# Altium PCB Solar_950_VDC_Standby_PS.PcbDoc (part 2 of 2)
Units mm, origin at the board's own origin, x right, y up, seen from the top; angles counter-clockwise.
Board outline 215 x 110 mm, 2 copper layers (Top Layer, Bottom Layer), stack 1.071 mm thick; 170 components, 77 nets, 404 pads, 55 vias.
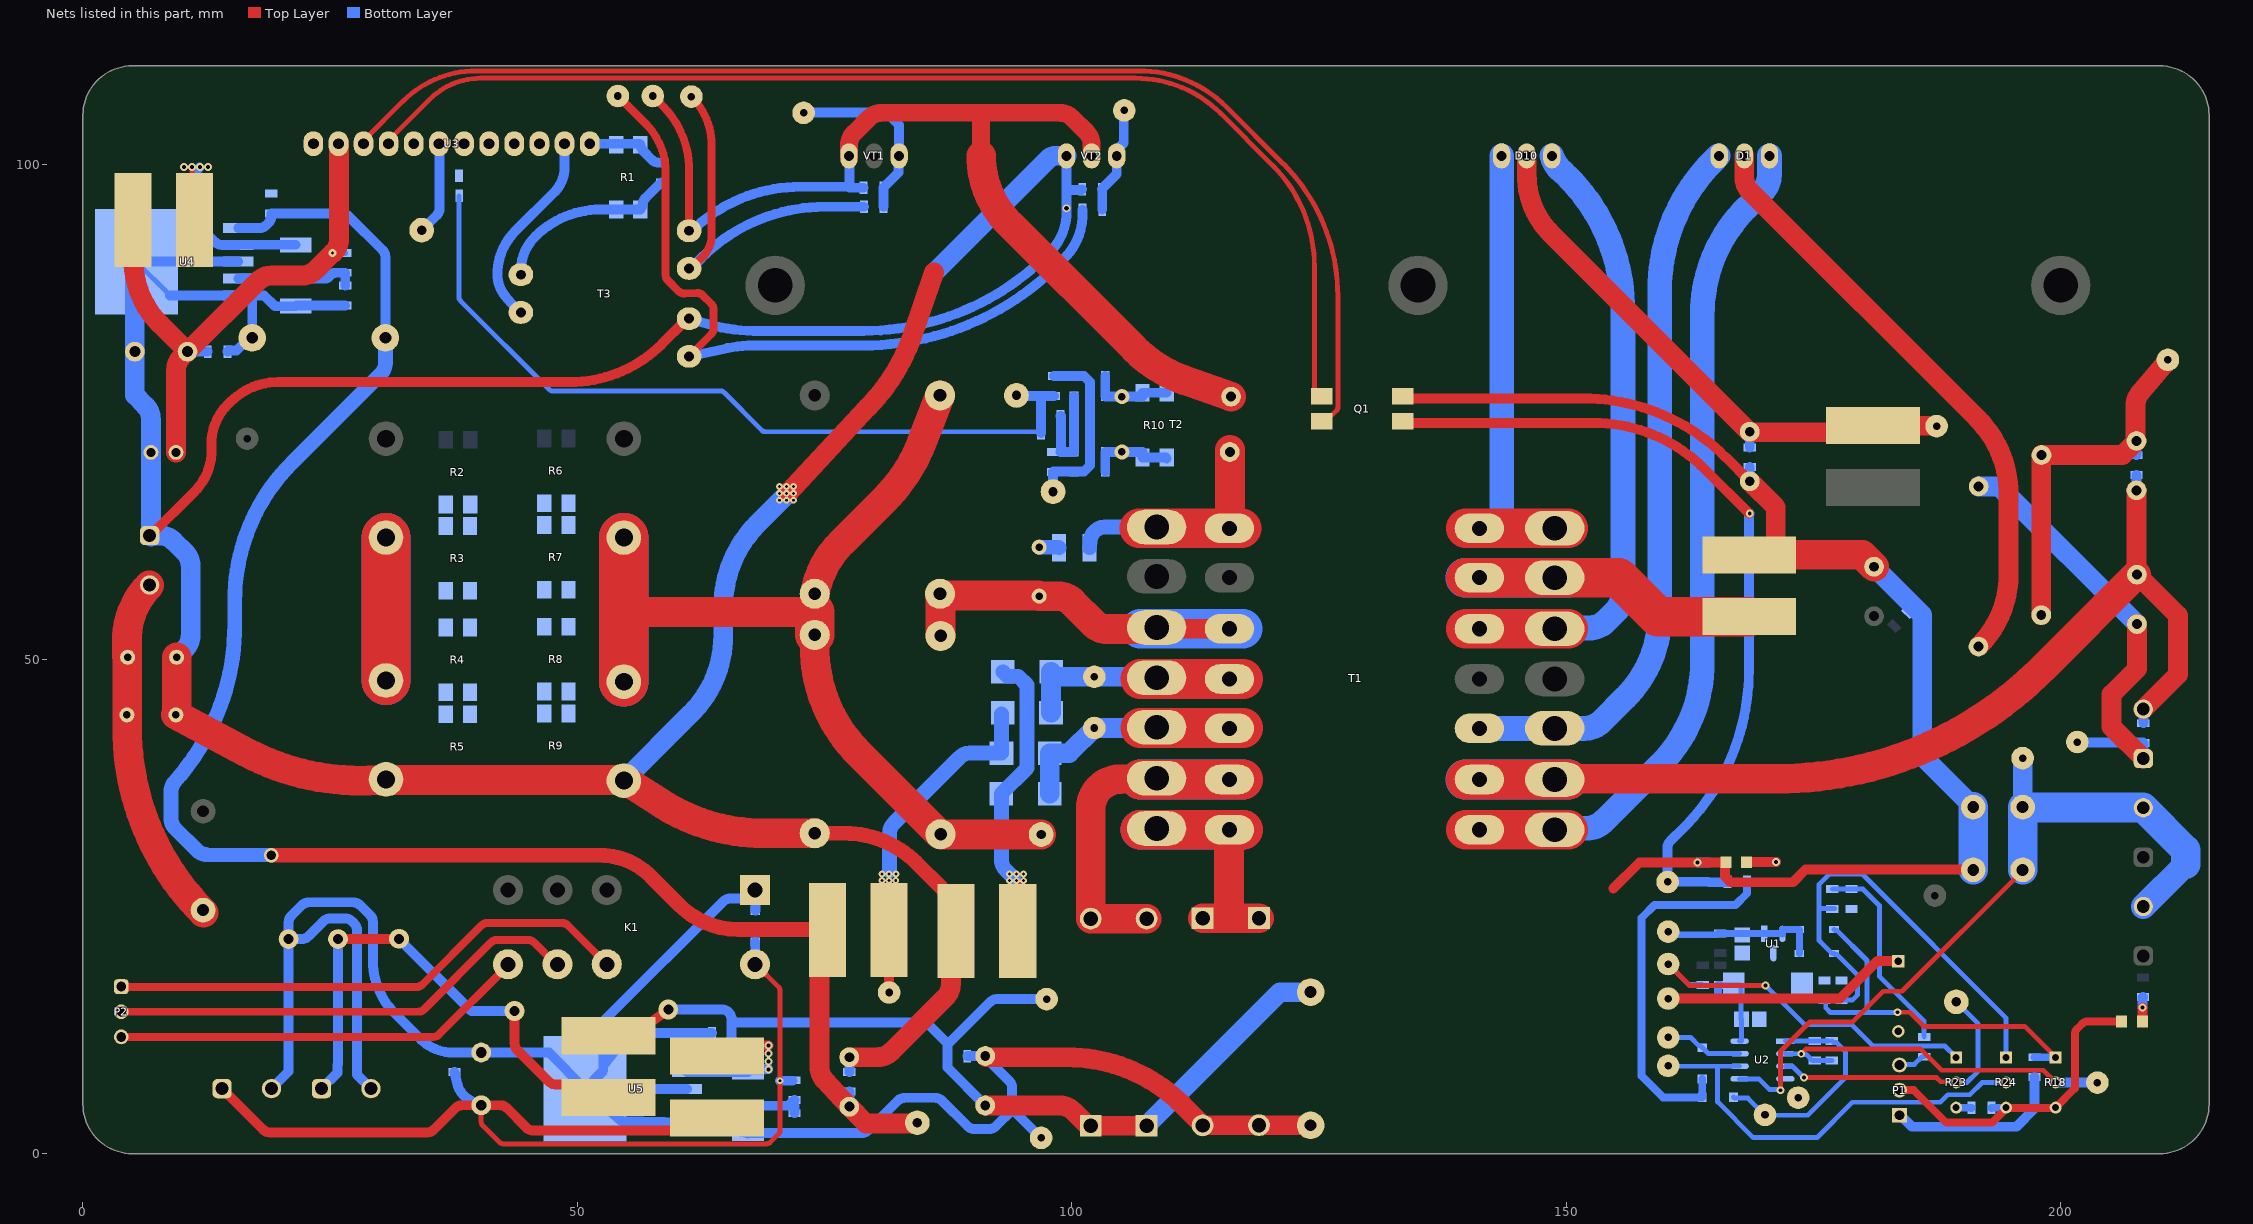
[diagram p2: the nets of this part, all layers, seen from the top]

## Via types
v1: diameter 0.7, hole 0.3, Top Layer to Bottom Layer, tented both sides, 31 vias
v2: diameter 0.8, hole 0.4, Top Layer to Bottom Layer, tented both sides, 18 vias
v3: diameter 2, hole 1, Top Layer to Bottom Layer, tented both sides, 3 vias
v4: diameter 1.5, hole 1, Top Layer to Bottom Layer, tented both sides, 1 vias
v5: diameter 0.8, hole 0.3, Top Layer to Bottom Layer, tented both sides, 1 vias
v6: diameter 0.8, hole 0.5, Top Layer to Bottom Layer, tented both sides, 1 vias

## Nets (pads, with @x,y where several pads share a name; then routed paths per layer and width w, separated by ;. In a path a pad name is that pad's centre, name@x,y a point inside that pad or via, vN(x,y) a via of type N, cw(c..) or ccw(c..) an arc to the next point about the centre after c; other vN are vias at no path point) (continued)
GND: C1.1 C5.2 C6.2 C9.2 C11.2 C13.1 C20.1 C21.1 C22.1 C30.1 C32.1 C38.1 C39.1 D12.2 D17.2 D18.2 J1.1 L7.1 R5.1 R9.1 R19.2 R27.2 R37.1 T3.6 U3.3 U3.4 U3.5 U3.6 U3.8 U3.12 U4.3 U4.5 U4.6 VD1.1 VT2.3 X1.2 | length 404.1
  Top Layer w1: J1.1@6.837,62.5 11.317,66.98 ccw(c7.257,71.042) 13,71.042 13,71.044 13,71.825 13,71.827 cw(c18.487,71.827) 14.599,75.699 14.937,76.037 14.938,76.038 cw(c19.744,71.219) 19.744,78.025 49.257,78.025 49.26,78.025 ccw(c49.26,91.157) 58.534,81.859 60.853,84.178 cw(c61.558,83.469) 60.995,84.295 61.2,84.435 T3.6@61.3,84.435
  Top Layer w1.5: C13.1@74,32.4 77.011,32.4 cw(c77.011,22.045) 84.325,29.375 L7.1@86.822,26.878 ; L7.1@86.873,26.825 L7.1@87.406,26.25
  Top Layer w2: C5.2@30.65,37.85 C5.2@30.713,37.787 ; C11.2@54.638,37.787 C11.2@54.7,37.725 ; C11.2@54.7,37.725 cw(c54.204,35.787) C11.2@55.28,37.474 ; 68.806,32.4 68.809,32.4 ; v1@71.36,66.847 71.553,67.055 71.576,67.079 71.9,67.428 79.325,75.423 cw(c80.788,74.059) 79.362,75.462 ccw(c65.491,89.115) 83.913,82.833 86.05,89.1 ; C9.2@77.5,9.75 80.344,9.75 ccw(c80.344,11.75) 81.757,10.334 87.185,15.762 ccw(c85.769,17.175) 87.769,17.175 87.769,18.75 L7.1@88.281,22.5 L7.1@87.406,26.25
  Top Layer w3: C32.1@9.4,44.375 16.504,40.602 ccw(c28.089,62.416) C5.2@30.65,37.85 ; C32.1@9.475,44.45 C1.1@9.475,50.2 ; C5.2@30.713,37.787 C11.2@54.638,37.787 ; C11.2@55.28,37.474 58.534,35.398 ccw(c68.806,51.499) 68.806,32.4 ; 68.809,32.4 C13.1@74,32.4
  Bottom Layer w0.5: U4.6@5.405,90.2 U4.6@8.809,86.796 ; D18.2@21.525,85.695 D18.2@21.6,85.77 ; D17.2@100.184,76.637 D17.2@100.226,76.595
  Bottom Layer w1: U4.6@5.405,90.2 U4.3@15.71,90.2 ; U4.6@8.809,86.796 U4.5@15.71,86.796 U4.5@17.025,86.796 ; C38.1@14.625,81.1 14.625,81.125 14.725,81.225 15.533,81.225 16.808,82.5 VD1.1@17.119,82.5 17.119,86.702 U4.5@17.025,86.796 ; D18.2@21.525,85.695 19.43,85.695 18.329,86.796 U4.5@17.025,86.796 ; D18.2@21.6,85.77 R37.1@26.525,85.77 ; T3.6@61.34,84.366 63.854,83.711 ccw(c67.891,99.396) 67.827,83.2 67.83,83.2 78.922,83.2 ccw(c78.924,109.484) 97.817,91.211 ccw(c93.808,95.203) v6@99.451,95.599 ; C6.2@77.5,8.275 C9.2@77.5,9.75 ; R19.2@98.863,74.6 98.888,74.575 C21.1@98.888,72.85 98.888,70.976 98.862,70.95 100.2,70.95 D12.2@100.225,70.975 D17.2@100.226,76.595 ; v6(99.46,95.6) 99.46,97.45 ; VT2.3@99.46,100.9 99.46,97.45 ; R27.2@101.05,97.525 100.975,97.45 99.46,97.45
  Bottom Layer w2: U4.6@5.405,90.2 5.248,90.043 C39.1@5.248,81.1 5.248,76.702 6.289,75.661 6.29,75.66 cw(c4.875,74.247) 6.875,74.247 X1.2@6.875,70.914 J1.1@6.875,62.5 ; J1.1@6.75,62.5 J1.1@6.875,62.5 ; J1.1@6.875,62.4 J1.1@6.875,62.5 ; C1.1@9.475,50.2 10.314,51.039 ccw(c8.9,52.453) 10.9,52.453 10.9,59.404 ccw(c8.9,59.404) 10.314,60.818 9.218,61.914 ccw(c7.804,60.5) 7.804,62.5 J1.1@6.875,62.5 ; C11.2@54.7,37.725 61.506,44.531 ccw(c53.68,52.36) 64.75,52.36 64.75,52.363 64.75,55.283 64.75,55.288 cw(c76.669,55.288) 68.244,63.719 v1@71.125,66.6 ; 86.125,89.1 97.633,100.608 cw(c98.339,99.9) 98.339,100.9 VT2.3@99.46,100.9
  other v1: 70.45,66.075 71.15,66.075 71.85,66.075 70.45,66.779 71.15,66.779 71.85,66.779 70.45,67.475 71.15,67.475 71.85,67.475
GND_1: C23.1 C24.1 C25.1 C26.1 C27.2 C29.1 C31.1 C33.2 C34.2 C37.2@181.125,59.35 D13.2 D14.2 D15.2 L3.2 P1.2 Q1.2 R18.3 R21.1 R24.3 R33.1 R34.1 R35.1 TP31.1 U1.3 U2.4 | length 169.8
  Top Layer w0.8: P1.2@183.7,6.425 185.136,6.425 188.426,3.135 193.06,3.135 194.267,4.342 194.267,4.352 194.467,4.552 R24.3@194.467,4.66 ; R24.3@194.496,4.631 R18.3@199.452,4.631 ; R18.3@199.482,4.66 201.425,6.603 201.425,12.069 cw(c202.225,12.069) 201.659,12.634 202.166,13.141 cw(c202.731,12.575) 202.731,13.375 D14.2@206.15,13.375
  Top Layer w1: Q1.2@133.475,76.595 134.075,76.375 151.668,76.375 151.673,76.375 cw(c151.671,55.846) 166.169,70.381 C27.2@168.55,68 ; 154.75,26.8 157.4,29.45 v2(163.25,29.45) 166.124,29.45 D15.2@166.124,29.437 ; D15.2@166.137,29.475 166.087,29.425 166.087,28.982 166.033,28.929 166.033,28.036 166.619,27.45 172.907,27.45 174.182,28.725 R35.1@191.123,28.725
  Top Layer w2: C27.2@168.55,68 171.175,65.375 171.175,61.425 L3.2@170.3,60.55
  Top Layer w3: L3.2@168.5,60.55 179.925,60.55 C37.2@181.125,59.35
  Bottom Layer w0.8: R21.1@192.992,4.635 192.992,4.648 194.454,4.648 R24.3@194.467,4.66
  Bottom Layer w1: v2(163.25,29.45) R33.1@164.437,29.45 ; C27.2@168.55,68 C29.1@168.55,69.425
  Bottom Layer w2: C37.2@181.125,59.35 186,54.475 186,40.198 R34.1@191.15,35.048
  Bottom Layer w3: R35.1@191.15,28.698 R34.1@191.15,35.048
I_SENS: J4.2 J5.2 R34.2 R35.2 TP26.1 U2.5 | length 77.7
  Top Layer w0.5: v2(171.651,6.413) 171.651,10.328 174.648,13.325 178.95,13.325 182.05,16.425 183.95,16.425 196.15,28.625 R35.2@196.15,28.698
  Bottom Layer w0.5: U2.5@167.521,7.571 169.47,7.571 170.57,6.47 171.594,6.47 v2(171.651,6.413) ; R34.2@196.15,35.048 R34.2@196.186,35.011 ; J4.2@208.314,35.011 J4.2@208.35,34.975
  Bottom Layer w2: R34.2@196.15,35.048 TP26.1@196.15,40
  Bottom Layer w2.5: J5.2@208.35,25 212.625,29.275
  Bottom Layer w3: R35.2@196.15,28.698 R34.2@196.15,35.048 ; R34.2@196.186,35.011 J4.2@208.314,35.011 ; J4.2@208.35,34.975 212.625,30.7 212.625,29.275
NetC1_2: C1.2 C32.2 J1.2 RT1.1 | length 35.7
  Top Layer w3: C1.2@4.45,50.275 4.45,51.984 cw(c12.224,51.98) J1.2@6.721,57.472 ; C1.2@4.475,50.2 4.475,44.375 4.475,43.027 ccw(c30.903,43.027) RT1.1@12.2,24.355
NetC2_1: C2.1 C7.2 L1.2 L2.1 TP2.1 | length 37.1
  Top Layer w2: L1.2@198.025,54.453 198.025,70.622 L2.1@198.05,70.647 206.233,70.647 C2.1@207.661,72.075 ; C2.1@207.55,72.186 207.55,75.624 cw(c209.55,75.624) 208.017,76.908 TP2.1@210.839,80.275
  Bottom Layer w1: C7.2@207.661,70.625 C2.1@207.661,72.075
NetC2_2: C2.2 C7.1 C14.2 C15.1 J2.2 T1.9 | length 94
  Top Layer w2: C2.2@207.661,67.075 207.661,58.589 C14.2@207.7,58.55 207.725,58.55 211.85,54.425 211.85,48.45 J2.2@208.35,44.95
  Top Layer w3: T1.9@148.896,37.9 cw(c148.899,36.1) 148.899,37.9 171.216,37.9 171.22,37.9 ccw(c171.22,75.996) 198.138,49.038 C14.2@207.65,58.55
  Bottom Layer w1: C2.2@207.661,67.075 C7.1@207.661,68.625 ; C15.1@208.35,43.525 J2.2@208.35,44.95
NetC3_1: C3.1 C8.1 C16.2 D3.1 D5.1 L5.1 TP1.1 U5.1 VD2.2 | length 98
  Top Layer w1: L5.1@57.4,13.253 v3(59.2,14.575)
  Top Layer w2: C8.1@91.25,4.875 98.747,4.875 cw(c98.747,2.875) 100.159,4.291 101.52,2.93 101.811,2.93 D5.1@101.911,2.83 D3.1@107.561,2.83
  Bottom Layer w1: v3(59.2,14.575) 64.6,14.575 cw(c64.6,13.575) 65.6,13.575 65.6,13.253 ; U5.1@61.085,9.954 63.74,9.954 ccw(c63.74,10.954) 64.446,10.246 65.308,11.108 ccw(c64.6,11.814) 65.6,11.814 C16.2@65.6,12.2 65.6,13.253 ; 87.425,11.025 91.733,15.333 cw(c92.439,14.625) 92.439,15.625 TP1.1@97.45,15.625 ; C8.1@91.25,4.875 87.425,8.7 C3.1@87.425,9.85 87.425,11.131 85.596,12.96 ccw(c84.889,12.253) 84.889,13.253 65.6,13.253
  Bottom Layer w2: D3.1@107.561,2.83 121.062,16.331 VD2.2@124.15,16.331
NetC3_2: C3.2 C8.2 C16.1 C36.2 C37.2@20.8,21.7 C40.1 C41.2 D2.2 D4.2 D19.2 J3.2 J6.2 K1.1 R39.1 TP3.1 U5.3 U5.5 U5.6 VD2.1 VD3.2 | length 233.6
  Top Layer w2: C8.2@91.375,9.75 99.532,9.75 99.538,9.75 cw(c99.535,-6.762) 111.189,4.936 113.08,3.045 D2.2@113.225,2.9 ; D2.2@113.225,2.855 113.238,2.868 118.913,2.868 D4.2@118.925,2.88 124.139,2.88 VD2.1@124.15,2.869
  Bottom Layer w1: J3.2@19.075,6.575 20.8,8.3 C37.2@20.8,21.7 ; J6.2@29.125,6.575 27.725,7.975 C36.2@27.725,8.975 27.725,22.561 ccw(c26.725,22.561) 27.433,23.267 27.193,23.507 ccw(c26.486,22.8) 26.486,23.8 25.039,23.8 ccw(c25.039,22.8) 24.333,23.508 22.817,21.992 cw(c22.111,22.7) 22.111,21.7 C37.2@20.8,21.7 ; C41.2@40.275,10.217 47.113,10.217 U5.6@50.78,6.55 ; C41.2@40.275,10.234 37.575,10.234 37.398,10.234 cw(c37.398,14.837) 34.149,11.576 34.147,11.578 31.503,14.222 cw(c36.762,19.481) 29.325,19.484 29.325,23.411 ccw(c28.325,23.411) 29.032,24.118 28.017,25.133 ccw(c27.311,24.425) 27.311,25.425 22.864,25.425 ccw(c22.864,24.425) 22.158,25.133 21.092,24.067 ccw(c21.8,23.361) 20.8,23.361 C37.2@20.8,21.7 ; U5.3@61.085,6.55 U5.6@50.78,6.55 ; C16.1@63.6,12.2 55.85,12.2 ccw(c55.85,11.2) 55.144,11.908 54.47,11.234 U5.6@52.619,8.885 ; VD3.2@68,24.575 68,26.625 K1.1@67.975,26.65 67.14,25.815 65.48,25.815 ccw(c65.48,24.815) 64.773,25.523 52.911,13.661 ccw(c53.619,12.955) 52.619,12.955 U5.6@52.619,8.885 ; C3.2@89.425,9.85 89.438,9.862 C8.2@91.237,9.862 ; C8.2@91.25,9.781 93.675,7.356 cw(c92.968,6.649) 93.968,6.649 93.968,4.532 TP3.1@96.9,1.6 ; 94.025,4.475 92.331,2.781 cw(c91.625,3.489) 91.625,2.489 90.147,2.489 cw(c90.15,3.489) 89.445,2.78 86.868,5.357 ccw(c86.161,4.65) 86.161,5.65 83.118,5.65 ccw(c83.118,4.65) 82.412,5.358 79.435,2.381 cw(c78.729,3.089) 78.729,2.089 R39.1@71.95,2.089 67.294,2.089 D19.2@67.25,2.045 66.15,2.305 65.474,2.898 ccw(c64.815,2.146) 64.815,3.146 U5.5@61.085,3.146 61.077,3.154 54.47,3.29 U5.6@50.78,6.55 ; U5.6@50.78,6.55 52.619,8.389 U5.6@52.619,8.885
NetC4_2: C4.2 C5.1 R3.1 R4.2 | length 28.9
  Top Layer w5: C5.1@30.65,47.85 C4.2@30.65,62.3
  Bottom Layer w5: C5.1@30.65,47.85 C4.2@30.65,62.3
NetC6_1: C6.1 C9.1 C30.2 L6.1 TP11.1 U4.1 VD1.2 | length 178.5
  Top Layer w1: 52.3,30.175 52.302,30.175 ; 60.308,25.146 ccw(c66.272,31.106) 60.31,25.144
  Top Layer w1.5: v4(19.05,30.175) 52.3,30.175 ; 52.302,30.175 cw(c52.3,22.983) 57.388,28.066 60.308,25.146 ; 60.31,25.144 ccw(c66.272,31.106) 66.274,22.675 L6.1@74.475,22.675
  Top Layer w2: L6.1@74.475,21.825 74.475,8.78 ccw(c76.475,8.78) 75.012,7.417 77.453,4.799 ccw(c78.916,6.162) C9.1@77.5,4.75 C9.1@77.5,4.75 79.19,3.06 TP11.1@84.31,3.06
  Bottom Layer w1: U4.1@15.71,93.604 17.84,93.604 ccw(c17.84,94.604) 18.546,93.896 18.758,94.108 ccw(c18.05,94.814) 19.05,94.814 C30.2@19.05,95.075 26.182,95.075 cw(c26.182,94.075) 26.888,94.783 30.289,91.382 cw(c29.581,90.676) 30.581,90.676 VD1.2@30.581,82.5 ; C9.1@77.5,4.75 C6.1@77.5,6.275
  Bottom Layer w1.5: v4(19.05,30.175) 12.581,30.228 cw(c12.593,31.728) 11.534,30.666 9.339,32.861 cw(c10.4,33.921) 8.9,33.92 8.9,36.611 cw(c10.4,36.607) 9.283,37.609 ccw(c-8.412,53.468) 15.35,53.471 15.35,55.899 15.35,55.903 cw(c35.079,55.903) 21.114,69.839 30.142,78.867 ccw(c29.081,79.927) 30.581,79.927 VD1.2@30.581,82.5
NetC10_2: C10.2 C11.1 C12.1 C13.2 C17.2 C18.1 R7.1 R8.2 TP7.1 | length 110.4
  Top Layer w3: C11.1@54.7,47.725 54.835,47.725 55.085,47.475 C11.1@55.157,47.475 ; 54.7,54.775 74,54.775 ; C13.2@74,52.466 74,51.206 ccw(c89.163,51.206) 78.431,40.494 C17.2@86.629,32.296 ; C12.1@74,56.617 cw(c83.574,54.891) 76.686,61.761 81.08,66.155 ccw(c69.359,77.862) 84.808,71.881 C18.1@86.667,76.683 ; C17.2@86.725,32.296 86.734,32.287 86.768,32.287 86.78,32.275 TP7.1@96.9,32.275
  Top Layer w4: C13.2@74.025,52.491 74.025,54.775
  Top Layer w5: C11.1@54.7,47.725 54.7,54.775 C10.2@54.7,62.3
  Bottom Layer w5: C11.1@54.7,47.725 C10.2@54.7,62.3
NetC14_1: C14.1 C15.2 J2.1 L2.2 TP5.1 | length 46.2
  Top Layer w2: C14.1@207.7,53.55 207.7,49.025 205.125,46.45 205.125,43.175 J2.1@208.35,39.95
  Bottom Layer w1: TP5.1@201.575,41.625 201.625,41.575 208.3,41.575 C15.2@208.35,41.525 J2.1@208.35,39.95
  Bottom Layer w2: L2.2@191.7,67.472 193.778,67.472 C14.1@207.7,53.55
NetC17_1: C17.1 C18.2 C35.2 T1.3 | length 26.2
  Top Layer w2: C18.2@86.667,56.617 C18.2@86.842,56.442 ; T1.3@107.541,53.05 ccw(c107.538,54.35) T1.3@107.575,53.051
  Top Layer w3: C17.1@86.725,52.362 C18.2@86.725,56.442 ; C18.2@86.842,56.442 C35.2@96.633,56.442 ; C35.2@96.7,56.375 98.613,56.375 cw(c98.613,54.375) 100.026,55.791 102.182,53.635 ccw(c103.595,55.05) 103.595,53.05 T1.3@107.541,53.05
NetC19_1: C19.1 R1.2 T3.1 | length 19.2
  Bottom Layer w1: T3.1@44.282,88.88 44.282,89.253 cw(c49.197,89.253) 45.722,92.729 cw(c52.366,86.066) 52.366,95.475 53.7,95.475 R1.2@56.375,95.475 56.6,95.875 56.6,95.936 cw(c57.6,95.936) 56.891,96.641 58.22,97.97 cw(c58.929,97.265) C19.1@58.575,98.2
NetC19_2: C19.2 R1.1 U3.1 | length 8.2
  Bottom Layer w1: U3.1@51.249,102.125 53.925,102.125 56.275,102.125 R1.1@56.375,102.025 56.488,101.625 ccw(c57.373,102.091) 56.665,101.385 57.557,100.493 ccw(c58.264,101.2) 58.264,100.2 C19.2@58.575,100.2
NetC20_2: C20.2 D11.1 D16.1 R13.1 TP12.1 | length 18.4
  Bottom Layer w1: TP12.1@98.1,66.95 98.1,68.95 98.125,68.975 D11.1@100.225,68.975 101.239,68.975 101.85,69.586 101.85,78.039 101.239,78.65 D16.1@100.226,78.65 98.225,78.65 R13.1@98.2,78.625
NetC21_2: C21.2 R13.2 R19.1 R20.1 TP13.1 | length 82.4
  Bottom Layer w0.5: R20.1@38.025,96.824 38.025,86.619 ccw(c38.525,86.619) 38.171,86.266 47.166,77.271 47.167,77.27 ccw(c47.519,77.625) 47.519,77.125 64.468,77.125 cw(c64.468,76.625) 64.821,76.979 68.655,73.145 ccw(c69.007,73.5) 69.005,73 96.738,73 C21.2@96.888,72.85
  Bottom Layer w1: TP13.1@94.4,76.674 94.449,76.625 R13.2@98.2,76.625 ; C21.2@96.863,72.875 R19.1@96.863,74.6 96.863,76.563 96.925,76.625
NetC22_2: C22.2 R20.2 TP14.1 U3.7 | length 9.4
  Bottom Layer w1: TP14.1@34.319,93.419 35.759,94.859 ccw(c35.051,95.565) 36.051,95.565 C22.2@36.051,98.891 ; U3.7@36,102.125 36.05,102.075 C22.2@36.05,98.891
NetC23_2: C23.2 R17.1 TP15.1 U1.1 U1.2 VD6.2 VD7.2 | length 16.3
  Bottom Layer w0.7: TP15.1@160.307,22.14 165.19,22.14 165.302,22.252 R17.1@165.575,22.252 ; TP15.1@160.643,22.451 TP15.1@160.681,22.488 ; R17.1@165.514,22.238 R17.1@165.551,22.276 R17.1@165.575,22.252 ; VD7.2@173.562,20.226 VD6.2@173.562,22.676 171.889,22.676 171.852,22.639 U1.2@171.852,22.227 171.828,22.252 170.022,22.252 167.782,22.252 R17.1@165.575,22.252
NetC24_2: C24.2 R14.2 R18.1 VD6.1 | length 40.7
  Top Layer w0.5: v2(183.475,14.3) 184.725,14.3 186.15,12.875 196.347,12.875 R18.1@199.482,9.74
  Bottom Layer w0.5: C24.2@176.105,15.526 176.235,15.526 176.235,14.744 176.703,14.276 179.182,14.276 180.407,14.276 ; VD6.1@177.062,22.676 177.162,22.576 177.36,22.576 180.407,19.528 ; 178.71,21.225 180.407,19.528 ; v2(183.475,14.3) 183.361,14.3 183.336,14.276 180.407,14.276 ; 180.407,14.276 180.407,15.501 180.407,19.528
  Bottom Layer w0.8: R14.2@197.35,9.75 199.472,9.75 R18.1@199.482,9.74
NetC25_2: C25.2 R15.2 R16.1 | length 20.6
  Bottom Layer w0.5: R16.1@176.912,26.749 C25.2@178.844,26.749 180.001,26.749 181.65,25.1 181.65,17.925 186.15,13.425 186.15,11.95 186.2,11.9 R15.2@186.2,11.8
NetC26_2: C26.2 R16.2 R24.1 VD7.1 | length 45.8
  Bottom Layer w0.5: R16.2@177.118,24.774 175.603,24.774 175.568,24.739 ; C26.2@177.832,15.527 178.933,15.527 179.432,16.026 179.432,18.076 177.382,20.126 177.162,20.126 VD7.1@177.062,20.226 176.912,20.226 175.648,21.49 175.568,21.569 175.568,24.739 ; R24.1@194.467,9.74 194.467,11.887 194.454,11.9 194.454,13.746 179.9,28.3 176.625,28.3 175.568,27.243 175.568,24.739
NetC27_1: C27.1 C29.2 D10.2 L4.1 TP20.1 | length 57.6
  Top Layer w2: D10.2@146,100.9 146,98.983 ccw(c154.501,98.996) 148.48,92.995 C27.1@168.475,73 ; C27.1@168.55,73 168.6,72.95 180.325,72.95 L4.1@181,73.625 181.025,73.6 187.425,73.6 TP20.1@187.45,73.575
  Bottom Layer w1: C29.2@168.55,71.425 C27.1@168.55,73
NetC28_1: C28.1 R26.1 TP30.1 U2.1 VD10.2 | length 23.8
  Bottom Layer w0.5: VD10.2@166.901,5.721 167.012,5.61 168.361,5.61 TP30.1@170.045,3.926 ; TP30.1@170.055,3.887 174.432,3.887 178.219,7.674 178.219,10.34 177.3,11.258 177.009,11.258 C28.1@176.859,11.408 ; U2.1@172.154,11.381 172.167,11.394 175.11,11.394 C28.1@176.499,11.394 ; R26.1@175.11,11.408 C28.1@176.512,11.408
NetC28_2: C28.2 R18.2 R26.2 TP18.1 U2.2 | length 36.7
  Top Layer w0.5: v2(173.757,10.101) 174.262,10.605 185.786,10.605 187.956,8.435 198.247,8.435 R18.2@199.482,7.2
  Bottom Layer w0.5: U2.2@172.154,10.111 172.159,10.106 173.752,10.106 173.815,10.043 174.249,10.043 174.885,9.408 C28.2@176.859,9.408 ; R18.2@199.482,7.2 R18.2@199.494,7.187 ; TP18.1@203.693,7.2 TP18.1@203.705,7.187
  Bottom Layer w1: R18.2@199.494,7.187 TP18.1@203.705,7.187 TP18.1@203.838,7.187
NetC33_1: C33.1 C34.1 D13.1 R29.1 TP27.1 U2.8 | length 39.6
  Top Layer w1: TP27.1@160.307,15.688 177.663,15.688 181.45,19.475 D13.1@183.575,19.475
  Bottom Layer w0.5: R29.1@165.176,16.901 165.326,17.051 R29.1@165.551,17.051 167.687,17.051 167.687,13.6 C33.1@167.712,13.576 167.712,11.401 167.692,11.381 U2.8@167.521,11.381
  Bottom Layer w0.8: TP27.1@160.37,15.651 164.976,15.651 165.326,16.001 165.326,17.051 R29.1@165.551,17.051
NetC35_1: C35.1 R36.2 | length 2
  Bottom Layer w1.5: C35.1@96.7,61.325 96.705,61.32 98.654,61.32 R36.2@98.699,61.275
NetC36_1: C36.1 C37.1@25.8,21.7 J6.1 L5.2 | length 52
  Top Layer w1: C37.1@26.059,21.246 cw(c26.768,21.952) C37.1@25.8,21.7 v3@31.95,21.7 ; v3(43.65,14.425) 43.65,11.164 ccw(c44.65,11.164) 43.942,10.458 47.1,7.3 ccw(c47.807,8.007) 47.807,7.007 48.9,7.007 L5.2@53.15,5.675
  Bottom Layer w1: J6.1@24.125,6.575 25.725,8.175 C36.1@25.725,8.975 25.8,9.05 C37.1@25.8,21.7 ; v3(31.975,21.725) 39.275,14.425 v3(43.65,14.425)
NetC38_2: C38.2 C39.2 L8.2 R28.2 U3.11 X1.1 | length 58.9
  Top Layer w2: L8.2@5.107,94.343 5.107,90.65 5.107,90.375 ccw(c14.282,90.375) 7.785,83.897 C39.2@10.582,81.1 17.696,88.214 cw(c19.111,86.8) 19.109,88.8 22.153,88.802 ccw(c22.149,90.802) 23.561,89.386 v5(25.25,91.075) ; X1.1@9.415,70.914 9.415,79.186 cw(c11.415,79.186) 9.999,80.599 C39.2@10.5,81.1 ; v5@25.313,91.075 ccw(c23.9,92.491) 25.9,92.491 U3.11@25.9,102.193
  Bottom Layer w0.58: v5(25.25,91.075) 26.19,91.075 R28.2@26.525,91.075
  Bottom Layer w1: C39.2@10.582,81.1 C38.2@12.625,81.1
NetC40_2: C40.2 C41.1 J3.1 K1.8 L9.2 R38.2 VD3.1 | length 113.9
  Top Layer w0.5: C41.1@40.275,4.9 40.275,3.207 ccw(c40.775,3.207) 40.421,2.854 42.129,1.146 ccw(c42.482,1.5) 42.482,1 69.148,1 ccw(c69.148,1.5) 69.501,1.146 70.329,1.974 ccw(c69.975,2.327) 70.475,2.327 v1(70.475,7.375) 70.475,16.518 ccw(c69.975,16.518) 70.329,16.871 68.171,19.029 ccw(c67.817,18.675) K1.8@67.976,19.15
  Top Layer w1: J3.1@14.125,6.525 18.207,2.443 ccw(c18.914,3.15) 18.914,2.15 34.786,2.15 ccw(c34.786,3.15) 35.493,2.443 37.658,4.608 cw(c38.364,3.9) 38.364,4.9 C41.1@40.275,4.9 42.161,4.9 cw(c42.161,3.9) 42.867,4.608 44.832,2.643 ccw(c45.539,3.35) 45.539,2.35 62.825,2.35 L9.2@64.1,3.625
  Bottom Layer w0.5: K1.8@67.975,19.15 K1.8@67.987,19.162 ; VD3.1@67.975,21.4 VD3.1@67.987,21.388
  Bottom Layer w1: C40.2@37.575,8.25 37.867,7.04 ccw(c40.306,7.628) 39.294,5.332 C41.1@40.275,4.9 ; K1.8@67.987,19.162 VD3.1@67.987,21.388 ; v1(70.475,7.375) R38.2@71.783,7.375
NetD1_1: D1.1 T1.8 | length 78
  Bottom Layer w2.5: T1.8@148.834,32.758 cw(c149.665,30.4) 149.665,32.9 152.014,32.9 ccw(c152.014,35.4) 153.781,33.631 159.507,39.357 ccw(c149.228,49.615) 163.75,49.615 163.75,49.619 163.75,84.869 163.75,84.874 cw(c178.961,84.874) 168.194,95.619 169.809,97.234 ccw(c168.04,99.001) 170.54,99.001 D1.1@170.54,100.9
NetD1_2: D1.2 L1.1 | length 60.9
  Top Layer w2: D1.2@168,100.9 168,98.728 ccw(c170,98.728) 168.584,97.316 191.566,74.334 191.567,74.333 cw(c183.918,66.698) 194.725,66.7 194.725,66.694 194.725,58.541 cw(c184.554,58.541) L1.1@191.753,51.356
NetD1_3: D1.3 T1.10 | length 73.3
  Bottom Layer w2.5: T1.10@141.214,43.004 T1.10@148.834,43.004 151.818,43.004 ccw(c151.818,45.504) 153.585,43.735 155.986,46.136 ccw(c147.595,54.511) 159.45,54.511 159.45,87.334 159.45,87.339 cw(c177.886,87.339) 164.836,100.361 D1.3@165.375,100.9
NetD2_1: D2.1 D4.1 T1.7 | length 14.5
  Top Layer w3: D2.1@113.25,23.82 D4.1@118.925,23.82 ; 115.9,23.925 T1.7@115.9,32.758
  Bottom Layer w2: D2.1@113.225,23.795 D2.1@113.238,23.808 ; D4.1@118.913,23.808 D4.1@118.925,23.82
NetD3_2: D3.2 D5.2 T1.6 | length 25.1
  Top Layer w3: D3.2@107.561,23.77 D5.2@101.911,23.77 101.911,34.869 cw(c104.911,34.869) 104.834,37.868 T1.6@108.575,37.965
NetD6_1: D6.1 D8.1 L6.2 TP4.1 | length 34.2
  Top Layer w0.5: v1(81.495,27.607) 81.525,27.576 L6.2@81.525,22.625
  Top Layer w1: TP4.1@81.525,16.298 L6.2@81.525,22.625
  Bottom Layer w0.5: TP4.1@81.525,16.298 TP4.1@81.548,16.321 ; D6.1@92.894,44.45 D6.1@93.019,44.575
  Bottom Layer w1.5: v1@81.575,28.6 81.575,32.379 cw(c83.075,32.379) 82.013,33.438 88.636,40.061 cw(c89.696,39) 89.696,40.5 D8.1@92.894,40.5 D6.1@92.894,44.45
  other v1: 80.795,27.607 82.195,27.607 80.804,28.285 81.504,28.285 82.204,28.285
NetD6_2: D6.2 D7.1 T1.4 TP8.1 | length 15.1
  Bottom Layer w2: D6.2@97.9,44.575 97.906,44.581 D7.1@97.906,48.725 98.406,48.225 TP8.1@102.275,48.225 108.475,48.225 T1.4@108.575,48.125
NetD7_2: D7.2 D9.2 L7.2 | length 29.4
  Top Layer w0.3: L7.2@94.531,22.5 94.531,27.031 v1(95.1,27.6)
  Top Layer w1: L7.2@94.475,22.556 L7.2@94.531,22.5
  Bottom Layer w1.5: D7.2@93.025,48.725 93.475,48.275 94.582,48.275 95.461,47.396 95.461,38.986 D9.2@92.875,36.4 92.875,29.74 ccw(c94.375,29.74) 93.314,28.68 93.712,28.282 94.047,27.947 94.094,27.9
  other v1: 93.7,27.6 94.4,27.6 93.709,28.279 94.409,28.279 95.109,28.279
NetD8_2: D8.2 D9.1 T1.5 TP10.1 | length 16
  Bottom Layer w2: D9.1@97.756,36.4 97.775,36.419 D8.2@97.775,40.5 99.73,40.5 TP10.1@102.275,43.045 108.489,43.045 T1.5@108.575,43.131
NetD10_1: D10.1 T1.12 | length 53.7
  Bottom Layer w2.5: D10.1@148.54,100.9 ccw(c150.969,101.492) 149.199,99.726 149.17,99.694 cw(c136.586,85.303) 153.994,93.204 cw(c136.363,85.202) 155.725,85.202 155.725,56.61 cw(c153.225,56.611) 154.994,54.844 154.031,53.881 cw(c152.264,55.65) 152.264,53.15 T1.12@150.197,53.15
NetD10_3: D10.3 T1.14 | length 43
  Bottom Layer w2.5: D10.3@143.46,100.9 143.46,63.315 143.537,63.238 T1.14@148.834,63.238
NetD11_2: D11.2 D12.1 R10.2 T2.4 | length 8.4
  Bottom Layer w1: D11.2@103.375,68.975 D12.1@103.375,70.975 103.394,70.956 T2.4@105.068,70.956 R10.2@107.15,70.956 ; R10.2@107.15,70.4 107.3,70.55 107.3,70.475 107.375,70.4 109.5,70.4 R10.2@109.6,70.3
NetD14_1: D14.1 R30.1 | length 2.5
  Top Layer w1: v2(208.275,14.775) 208.275,13.425 D14.1@208.325,13.375
  Bottom Layer w1: v2(208.275,14.775) 208.275,15.786 R30.1@208.314,15.825
NetD15_1: D15.1 R31.1 | length 4.1
  Top Layer w1: D15.1@168.237,29.475 v2(171.216,29.475)
  Bottom Layer w1: R31.1@170.061,29.474 v2@171.216,29.475
NetD16_2: D16.2 D17.1 R10.1 T2.3 | length 8.2
  Bottom Layer w1: D17.1@103.376,76.595 D16.2@103.376,78.65 ; D17.1@103.421,76.55 T2.3@105.068,76.55 R10.1@107.15,76.55 ; R10.1@107.15,76.95 R10.1@109.6,76.95
NetD18_1: D18.1 L8.1 U4.2 | length 22.1
  Top Layer w0.5: L8.1@11.032,94.668 v2(11.032,99.774)
  Top Layer w1: L8.1@11.032,94.668 L8.1@11.3,94.4
  Bottom Layer w0.5: U4.2@15.71,91.902 U4.2@15.713,91.905
  Bottom Layer w1: v2@11.8,99.725 11.5,99.425 11.5,94.857 ccw(c13.447,94.857) 12.068,93.482 13.356,92.194 ccw(c14.062,92.902) 14.062,91.902 U4.2@15.71,91.902 ; U4.2@15.713,91.905 D18.1@21.525,91.905
  other v2: 10.232,99.774 11.832,99.774 12.632,99.774
NetD19_1: D19.1 L9.1 U5.2 | length 14
  Top Layer w1: L9.1@64.1,9.875 65.153,10.928 v2(69.311,10.928)
  Bottom Layer w1: U5.2@61.085,8.252 67.247,8.252 D19.1@67.25,8.255 67.51,8.515 68.901,8.515 68.936,8.55 v2@69.3,8.55
  other v2: 69.311,8.528 69.311,9.328 69.311,10.128
NetK1_5: K1.5 P2.3 | length 42.2
  Top Layer w0.8: P2.3@3.875,11.81 35.429,11.81 ccw(c35.429,12.61) 35.994,12.044 42.781,18.831 ccw(c42.213,19.395) K1.5@42.975,19.15
NetK1_6: K1.6 P2.2 | length 48
  Top Layer w0.8: P2.2@3.875,14.35 33.919,14.35 ccw(c33.919,15.15) 34.484,14.584 41.266,21.366 cw(c41.831,20.8) 41.831,21.6 45.044,21.6 cw(c45.044,20.8) 45.609,21.366 47.825,19.15 K1.6@47.975,19.15
NetK1_7: K1.7 P2.1 | length 53.4
  Top Layer w0.8: P2.1@3.875,16.89 3.915,16.85 33.744,16.85 ccw(c33.744,17.65) 34.309,17.084 40.316,23.091 cw(c40.881,22.525) 40.881,23.325 48.469,23.325 cw(c48.469,22.525) 49.034,23.091 K1.7@52.975,19.15
NetL3_1: L3.1 T1.13 | length 21.3
  Top Layer w4: T1.13@148.834,58.244 150.214,58.244 155.306,58.244 159.25,54.3 L3.1@168.5,54.3
NetQ1_1: Q1.1 R32.2 R33.2 TP32.1 | length 83.7
  Top Layer w1: Q1.1@133.475,74.055 134.075,73.9 152.736,73.9 152.741,73.9 cw(c152.739,58.001) 163.984,69.241 v2@168.5,64.725
  Bottom Layer w1: TP32.1@160.225,27.474 160.225,30.897 cw(c161.225,30.897) 160.517,31.603 161.899,32.985 ccw(c145.998,48.856) 168.464,48.856 168.464,48.858 168.464,64.322 cw(c169.464,64.319) v2(168.55,64.725) ; TP32.1@160.276,27.5 R33.2@164.312,27.5 ; R33.2@164.437,27.45 R32.2@166.237,27.45
NetQ1_3: Q1.3 U3.9 | length 120
  Top Layer w0.5: U3.9@30.92,102.125 30.92,102.387 30.978,102.497 cw(c31.42,102.263) 31.066,102.616 35.084,106.634 cw(c40.212,101.479) 40.212,108.75 106.443,108.75 cw(c106.445,96.546) 115.053,105.197 120.334,99.916 cw(c110.127,89.761) 124.525,89.761 124.525,77.195 125.125,76.595 Q1.3@125.275,76.595
NetQ1_4: Q1.4 U3.10 | length 127.5
  Top Layer w0.5: U3.10@28.38,102.125 28.38,102.387 28.477,102.519 cw(c28.88,102.223) 28.526,102.576 32.406,106.456 cw(c39.782,99.042) 39.782,109.5 39.784,109.5 106.795,109.5 cw(c106.796,96.996) 115.615,105.86 121.394,100.081 cw(c107.98,86.738) 121.395,100.08 cw(c107.98,86.738) 126.9,86.737 126.9,75.487 cw(c126.4,75.487) 126.754,75.134 126.125,74.505 Q1.4@125.275,74.055
NetR2_1: R2.1 R3.2
NetR4_1: R4.1 R5.2
NetR6_1: R6.1 R7.2
NetR8_1: R8.1 R9.2
NetR11_1: R11.1 T3.4 TP16.1 | length 38.3
  Top Layer w0.8: T3.4@61.3,89.515 61.4,89.515 61.605,89.654 ccw(c61.043,90.481) 61.75,89.774 62.692,90.717 ccw(c60.552,92.851) 63.575,92.851 63.575,101.997 63.575,102.001 ccw(c56.713,102) TP16.1@61.565,106.853
  Bottom Layer w1: T3.4@61.334,89.365 62.57,90.601 cw(c75.025,78.112) 74.982,95.75 75.027,95.75 R11.1@78.975,95.75
NetR11_2: R11.2 R25.1 TP21.1 VT1.1 | length 19.1
  Bottom Layer w1: TP21.1@72.875,105.3 81.255,105.3 82.54,104.015 VT1.1@82.54,100.9 82.481,100.841 82.481,99.206 81.175,97.9 81.15,97.9 80.95,97.7 R25.1@80.95,97.675 80.975,97.65 R11.2@80.975,95.75
NetR12_1: R12.1 T3.5 TP17.1 | length 78
  Top Layer w0.8: TP17.1@54.1,106.951 56.932,104.119 cw(c52.129,99.311) 58.925,99.311 58.925,88.856 ccw(c59.725,88.856) 59.16,88.29 60.236,87.214 ccw(c60.8,87.781) 60.824,86.982 60.827,86.982 62.119,87.025 cw(c62.119,86.225) 62.685,86.79 63.541,85.934 cw(c62.975,85.369) 63.775,85.369 63.775,83.431 cw(c62.975,83.431) 63.541,82.866 T3.5@61.3,80.625
  Bottom Layer w1: T3.5@61.3,80.625 61.4,80.625 65.198,81.452 cw(c67.735,69.801) 67.735,81.725 67.737,81.725 78.943,81.725 78.947,81.725 ccw(c78.947,109.437) 98.521,89.821 99.261,90.561 ccw(c94.865,94.947) 101.075,94.942 R12.1@101.075,95.45
NetR12_2: R12.2 R27.1 TP22.1 VT2.1 | length 10.8
  Bottom Layer w1: R27.1@103.05,97.525 103.075,97.5 R12.2@103.075,95.45 ; R27.1@103.125,97.65 104.54,99.065 104.54,101.498 105.25,102.208 TP22.1@105.25,105.45
NetR21_2: R21.2 R23.3 | length 1.6
  Bottom Layer w0.8: R23.3@189.427,4.66 189.439,4.648 190.992,4.648 R21.2@190.992,4.635
NetR22_1: R22.1 R23.1 TP19.1 | length 37.5
  Top Layer w0.5: TP19.1@160.307,19.176 162.458,17.025 v2(170.125,17.025)
  Bottom Layer w0.5: TP19.1@160.307,19.176 162.392,17.091 162.717,17.091 163.747,17.091 R22.1@163.788,17.051 ; TP19.1@160.332,19.201 TP19.1@160.383,19.151 ; v2(170.125,17.025) 174.1,13.05 178.875,13.05 181.05,10.875 188.292,10.875 R23.1@189.427,9.74
NetR23_2: R23.2 TP23.1 U2.3 | length 28.5
  Top Layer w0.5: v2(174.037,7.7) 187.425,7.7 187.85,7.275 189.352,7.275 R23.2@189.427,7.2
  Bottom Layer w0.5: U2.3@172.154,8.841 172.162,8.832 172.868,8.832 v2@174,7.7 ; R23.2@189.427,7.2 190.511,7.2 191.65,8.339 191.65,13.139 TP23.1@189.439,15.35
NetR24_2: R24.2 TP24.1 U2.6 | length 43.8
  Bottom Layer w0.5: TP24.1@160.307,8.884 160.35,8.841 163.554,8.841 165.25,8.841 ; U2.6@167.521,8.841 165.45,8.841 165.25,8.841 ; R24.2@194.467,7.2 192.05,7.2 190.806,5.956 188.581,5.956 187.825,5.2 178.925,5.2 175.35,1.625 168.921,1.625 165.302,5.244 165.302,8.789 165.25,8.841
NetR25_2: R25.2 T2.1 T3.3 TP25.1 VT1.3 VT2.2 | length 107.1
  Top Layer w0.8: TP25.1@57.681,106.95 58.753,105.826 cw(c52.087,99.467) 61.3,99.488 61.3,99.464 T3.3@61.3,93.325
  Top Layer w1.8: VT1.3@77.46,100.9 77.46,101.939 cw(c79.26,101.939) 77.985,103.21 79.5,104.725 cw(c80.771,103.45) 80.771,105.25 98.779,105.25 cw(c98.779,103.45) 100.05,104.725 101.475,103.3 cw(c100.2,102.029) 102,102.029 VT2.2@102,100.9 ; 90.825,100.919 90.825,100.922 90.825,105.025 ; 93.674,94.051 93.677,94.048 ; 106.372,81.353 106.374,81.351
  Top Layer w3: 90.825,100.919 ccw(c100.528,100.919) 93.674,94.051 ; 93.677,94.048 106.372,81.353 ; 106.374,81.351 ccw(c115.716,90.693) 111.328,78.231 T2.1@116.102,76.55
  Bottom Layer w1: T3.3@61.425,93.175 cw(c72.552,82.017) 72.552,97.775 77.5,97.775 ; 77.5,97.713 77.5,97.775 ; VT1.3@77.5,100.86 77.5,97.775 ; 77.615,97.675 R25.2@78.95,97.675
NetR28_1: R28.1 R37.2 U4.4 | length 12.3
  Bottom Layer w1: U4.4@15.71,88.498 24.516,88.498 ccw(c24.516,88.998) 24.869,88.644 25.154,88.929 cw(c25.507,88.575) 25.507,89.075 R28.1@26.525,89.075 R37.2@26.525,87.77
NetR31_2: R31.2 R32.1 VD10.1 VD11.1 | length 39.4
  Bottom Layer w0.8: VD10.1@163.705,5.675 159.8,5.675 157.625,7.85 157.625,23.85 158.924,25.149 167.099,25.149 168.287,26.337 R32.1@168.287,27.5 R31.2@170.061,27.5 ; VD11.1@163.747,7.565 163.749,7.563 VD10.1@163.749,5.748
NetR36_1: R36.1 T1.1 T2.2 | length 23.5
  Top Layer w1.5: T1.1@108.575,63.365 115.814,63.365 T1.1@115.941,63.238
  Top Layer w3: T1.1@116,63.297 T2.2@116,71.181
  Bottom Layer w1.5: R36.1@101.801,61.275 101.868,62.003 cw(c103.361,61.865) 103.361,63.365 T1.1@108.575,63.365
NetR38_1: R38.1 R39.2 U5.4 | length 11.9
  Bottom Layer w1: U5.4@61.085,4.848 71.348,4.848 71.825,5.325 71.85,5.325 R38.1@71.95,5.425 ; R39.2@71.95,4.089 71.95,4.848
NetT3_2: T3.2 U3.2 | length 20.4
  Bottom Layer w1: 43.72,93.286 ccw(c48.103,88.916) 41.913,88.919 ccw(c45.356,88.916) 42.718,86.705 44.216,84.92 T3.2@44.316,84.92 ; 43.721,93.287 47.692,97.259 ccw(c45.254,99.693) 48.7,99.693 U3.2@48.7,102.125
NetTP28_1: TP28.1 U2.7 VD11.2 | length 7.9
  Bottom Layer w0.5: TP28.1@160.307,11.749 162.576,11.749 163.41,10.915 163.547,10.915 VD11.2@163.747,10.715 163.772,10.715 164.377,10.111 U2.7@167.521,10.111
PWM_I: P1.3 R15.1 | length 2.8
  Bottom Layer w0.5: P1.3@183.7,8.965 183.76,9.025 185.2,9.025 185.975,9.8 R15.1@186.2,9.8
PWM_V: P1.1 R14.1 | length 18
  Bottom Layer w1: P1.1@183.79,3.795 183.95,3.635 184.04,3.635 184.95,2.725 195.525,2.725 197.35,4.55 R14.1@197.35,7.75
pads on no net: K1.2 K1.3 K1.4 Radiator_1.1 T1.2 T1.11
copper on no net: | length 0.2
  Top Layer w1: 47.775,26.65 47.975,26.65
  other v1: 85.3,88.55 86,88.55 86.7,88.55 85.3,89.254 86,89.254 86.7,89.254 85.3,89.95 86,89.95 86.7,89.95

## Polygon pours and split planes (outlines as drawn)
GND on Bottom Layer "NONET_L-01_P-001" (solid, pour order 17): -0.05,79.275 24.1,79.275 41.08,79.275 41.08,91.73 50.85,101.5 50.85,110 15.15,110 -0.05,94.8 -0.05,79.7
GND on Bottom Layer "NONET_L-01_P-001" (solid, pour order 16): 95.425,70.15 94.1,71.475 68.275,71.475 63.6,76.15 43.327,76.15 37.55,81.927 37.55,92.325 40.676,95.451 40.676,100.663 42.819,102.806 43.032,102.593 43.032,94.451 39.763,91.182 39.763,87.145 48.533,78.375 65.375,78.375 69.6,74.15 91.625,74.15 92.25,74.775 92.25,77.175 94.1,79.025 95.75,79.025 96.95,77.825 99.921,77.825 100.676,77.07 100.675,77.069 100.675,70.15
GND_1 on Bottom Layer "NONET_L-01_P-001" (solid, pour order 15): 153.4,26.496 153.4,-0.075 202.125,-0.075 202.125,13 199.075,16.05 194.225,16.05 178.075,32.2 159.095,32.2
GND_1 on Top Layer "NONET_L-01_P-001" (solid, pour order 14): 153.45,26.472 153.45,-0.075 202.125,-0.075 202.125,12.95 199.025,16.05 194.225,16.05 178.075,32.2 159.169,32.2
NetR25_2 on Top Layer "NONET_L-01_P-001" (solid, pour order 9): 83.075,106.133 83.075,104.65 89.95,97.775 91.675,97.775 98.45,104.55 98.45,106.133

## Keep-outs
Keep-Out Layer:
  circle w0.254: c5,5 r1.5
  circle w0.254: c210,5 r1.5
  circle w0.254: c210,105 r1.5
  circle w0.254: c5,105 r1.5
  lines w0.254: 0,105 cw(c5,105) 5,110 210,110 cw(c210,105) 215,105 215,4.95 ; 0,105.024 0,5 ccw(c5,5) 5,0 210.025,0 ; 210,0 ccw(c210,5) 215,5 ; 128.369,23.529 ccw(c129.369,23.529) 130.369,23.529 130.369,31.279 ccw(c129.369,31.279) 128.369,31.279 128.369,23.529 ; 128.386,70.375 ccw(c129.386,70.375) 130.386,70.375 130.386,78.125 ccw(c129.386,78.125) 128.386,78.125 128.386,70.375

## Other copper
Top Layer:
  rectangle net GND: 70.075,65.65 72.225,67.925
  rectangle net GND: 84.925,88.125 87.075,90.4
  region net NetD18_1: 13.16,98.9 13.16,100.213 9.425,100.213 9.425,98.9
  rectangle net NetD19_1: 68.575,8 69.75,11.75
  rectangle net NetD6_1: 80.44,26.158 82.615,28.656
  rectangle net NetD7_2: 93.35,26.3 95.525,28.656
Bottom Layer:
  rectangle net GND: 70.084,65.641 72.234,67.916
  rectangle net GND: 84.925,88.125 87.075,90.4
  region net NetD18_1: 13.16,99.038 13.16,100.213 9.41,100.213 9.41,99.038
  rectangle net NetD19_1: 68.575,8 69.75,11.75
  rectangle net NetD6_1: 80.44,27.25 82.59,28.656
  rectangle net NetD7_2: 93.35,27.219 95.5,28.625
  rectangle net NetR8_1: 45.881,43.625 49.825,47.649
  rectangle net NetR4_1: 35.995,43.55 39.876,47.574
  rectangle net NetC10_2: 45.92,52.374 57.2,57.925
  rectangle net NetR6_1: 45.945,62.675 49.831,66.674
  rectangle net +950V: 45.776,70.781 55.433,73.225
  rectangle net GND: 45.776,37.049 55.433,39.3
  rectangle net NetR2_1: 35.991,62.575 39.852,66.549
  rectangle net +950V: 30.282,70.824 39.939,73.175
  rectangle net NetC4_2: 28.15,52.324 39.902,57.825
  rectangle net GND: 30.275,36.875 39.932,39.3
  rectangle net NetC10_2: 71.975,50.942 76.002,58.141
  rectangle net +20V: 163.163,18.651 166.176,20.676

## Silkscreen, mask and mechanical layers (free items; w line width, h text height)
Top Overlay:
  circle w1: c5,5 r2.2
  circle w1: c210,105 r2.2
  circle w1: c5,105 r2.2
  circle w1: c210,5 r2.2
  text "+12" at 2.604,71.771 h1 r270
  text "GND" at 0.854,71.721 h1 r270
  text "GND_VCC" at 0.921,63.221 h1 r270
  text "+20V_1 GND1" at 213.863,38.529 h0.8 r90
  text "+20V_2 GND2" at 213.813,27.929 h0.8 r90
  text "NC" at 1.504,22.654 h1
  text "COM" at 1.504,20.979 h1
  text "NO" at 1.504,19.254 h1
  text "+20V_2 GND2" at 213.813,17.804 h0.8 r90
  text "PWM_I_G_V" at 178.721,10.721 h1 r270
  text "b" at 129.369,3.775 h18
  text "+5V GND" at 13.004,1.054 h1
  text "+18V GND" at 22.654,1.054 h1
  text "I_SET" at 192.828,1.012 h0.8
  text "V_SET" at 197.701,1.012 h0.8
  text "V_REF" at 187.654,0.987 h0.8

## Text inside footprints (layer, text, board x,y; h text height)
C4: Top Overlay "-" at 32.682,62.982 h3.05 r270; Top Overlay "+" at 33.19,73.65 h3.05 r270
C5: Top Overlay "-" at 32.682,38.532 h3.05 r270; Top Overlay "+" at 33.19,49.2 h3.05 r270
C10: Top Overlay "-" at 56.732,62.982 h3.05 r270; Top Overlay "+" at 57.24,73.65 h3.05 r270
C11: Top Overlay "+" at 57.24,49.075 h3.05 r270; Top Overlay "-" at 56.732,38.407 h3.05 r270
U3: Bottom Overlay "GND" at 23.069,104.688 h0.8 r270; Bottom Overlay "VCC" at 25.736,104.561 h0.8 r270; Bottom Overlay "Vce" at 28.276,104.561 h0.8 r270; Bottom Overlay "Vee" at 30.689,104.561 h0.8 r270; Bottom Overlay "GND" at 33.229,104.561 h0.8 r270; Bottom Overlay "I_S" at 35.902,104.688 h0.8 r270; Bottom Overlay "GND" at 38.309,104.688 h0.8 r270; Bottom Overlay "GND" at 40.849,104.561 h0.8 r270; Bottom Overlay "GND" at 43.516,104.561 h0.8 r270; Bottom Overlay "GND" at 46.056,104.561 h0.8 r270; Bottom Overlay "OUT_B" at 48.475,104.561 h0.8 r270; Bottom Overlay "OUT_A" at 50.888,104.434 h0.8 r270; Top Overlay "VCC" at 25.609,106.801 h0.8 r270; Top Overlay "Vce" at 28.149,106.801 h0.8 r270; Top Overlay "Vee" at 30.689,106.801 h0.8 r270; Top Overlay "I_S" at 35.902,106.801 h0.8 r270; Top Overlay "OUT_B" at 48.475,107.944 h0.8 r270; Top Overlay "OUT_A" at 51.015,107.944 h0.8 r270; Top Overlay "GND" at 45.929,106.801 h0.8 r270; Top Overlay "GND" at 43.389,106.801 h0.8 r270; Top Overlay "GND" at 40.849,106.801 h0.8 r270; Top Overlay "GND" at 38.309,106.801 h0.8 r270; Top Overlay "GND" at 33.229,106.801 h0.8 r270; Top Overlay "GND" at 23.069,106.801 h0.8 r270; Top Overlay "VCC" at 25.609,99.054 h0.8 r270; Top Overlay "Vce" at 28.149,99.054 h0.8 r270; Top Overlay "Vee" at 30.689,99.054 h0.8 r270; Top Overlay "I_S" at 35.902,99.054 h0.8 r270; Top Overlay "OUT_B" at 48.475,100.197 h0.8 r270; Top Overlay "OUT_A" at 51.015,100.197 h0.8 r270; Top Overlay "GND" at 45.929,99.054 h0.8 r270; Top Overlay "GND" at 43.389,99.054 h0.8 r270; Top Overlay "GND" at 40.849,99.054 h0.8 r270; Top Overlay "GND" at 38.309,99.054 h0.8 r270; Top Overlay "GND" at 33.229,99.054 h0.8 r270; Top Overlay "GND" at 23.069,99.054 h0.8 r270